# Altium PCB Afrodite V11_Final_3K.PcbDoc
Units mm, origin at the board's own origin, x right, y up, seen from the top; angles counter-clockwise.
Board outline 76.01 x 102.81 mm, 2 copper layers (Top Layer, Bottom Layer); 40 components, 30 nets, 155 pads, 7 vias.
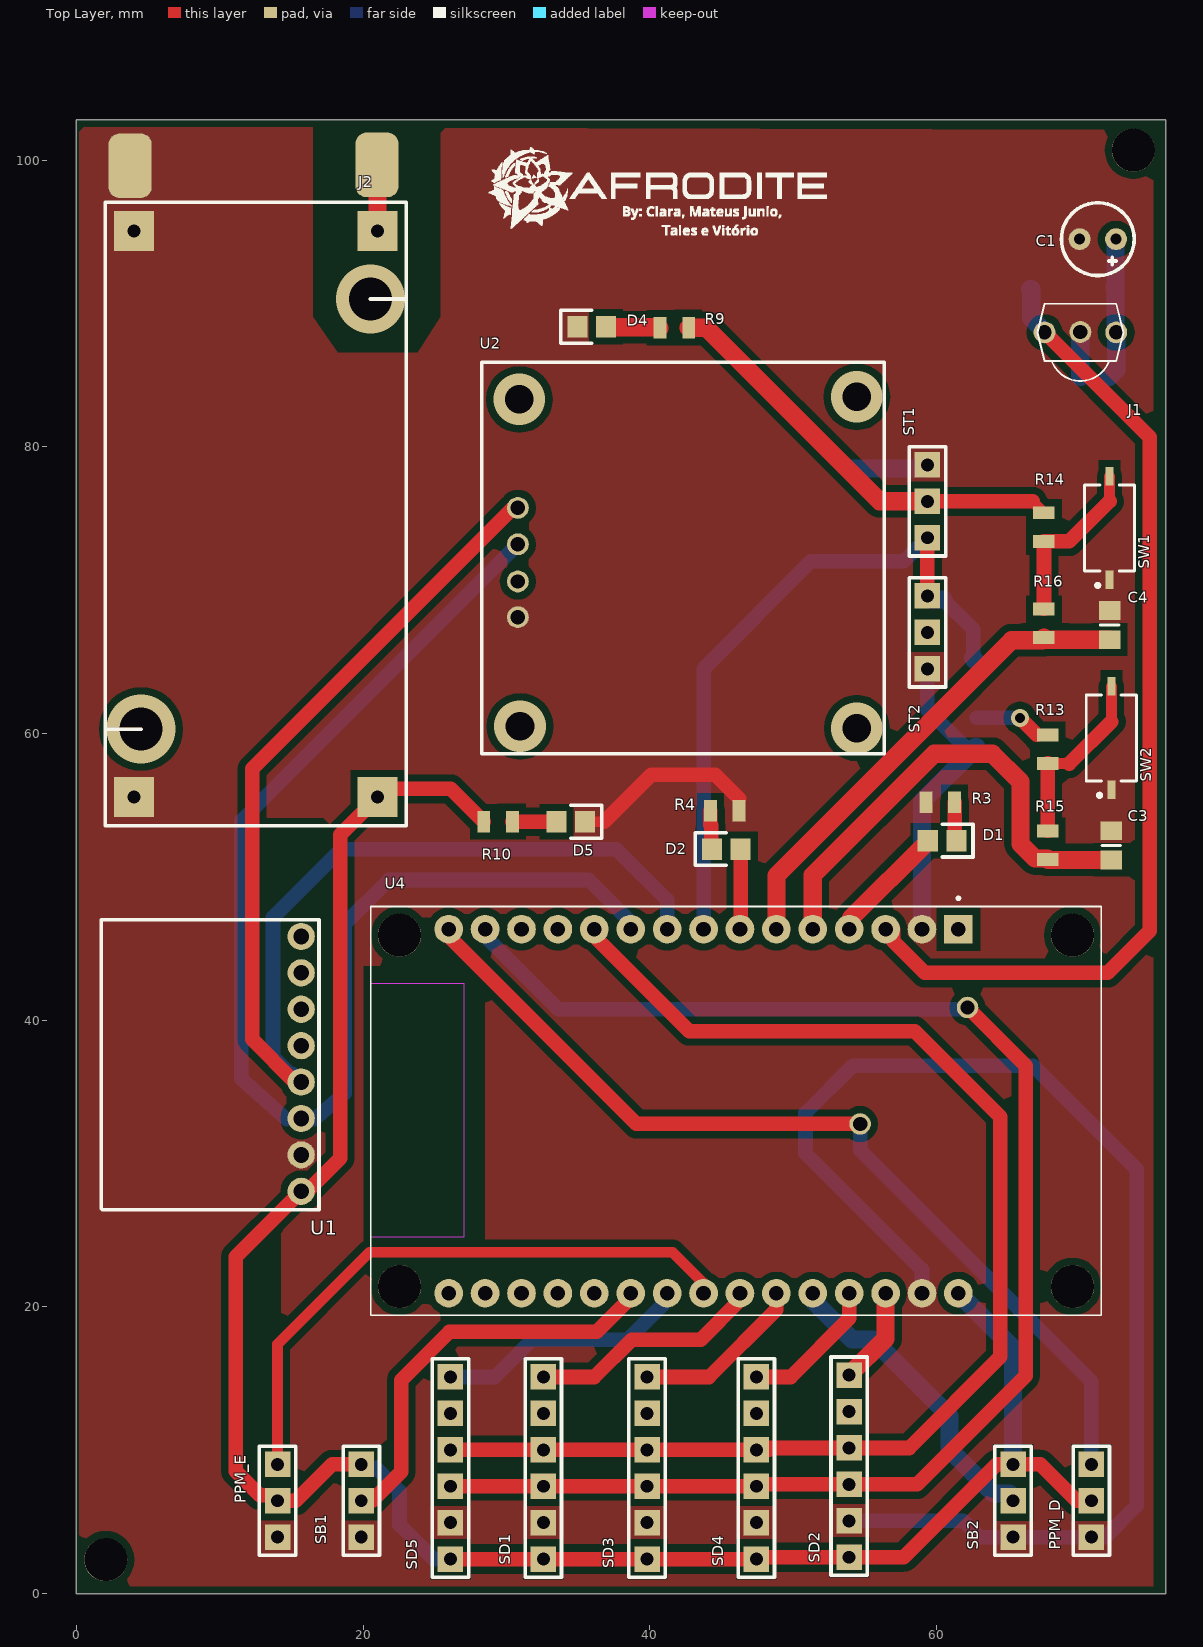
[diagram p0: Top Layer view]
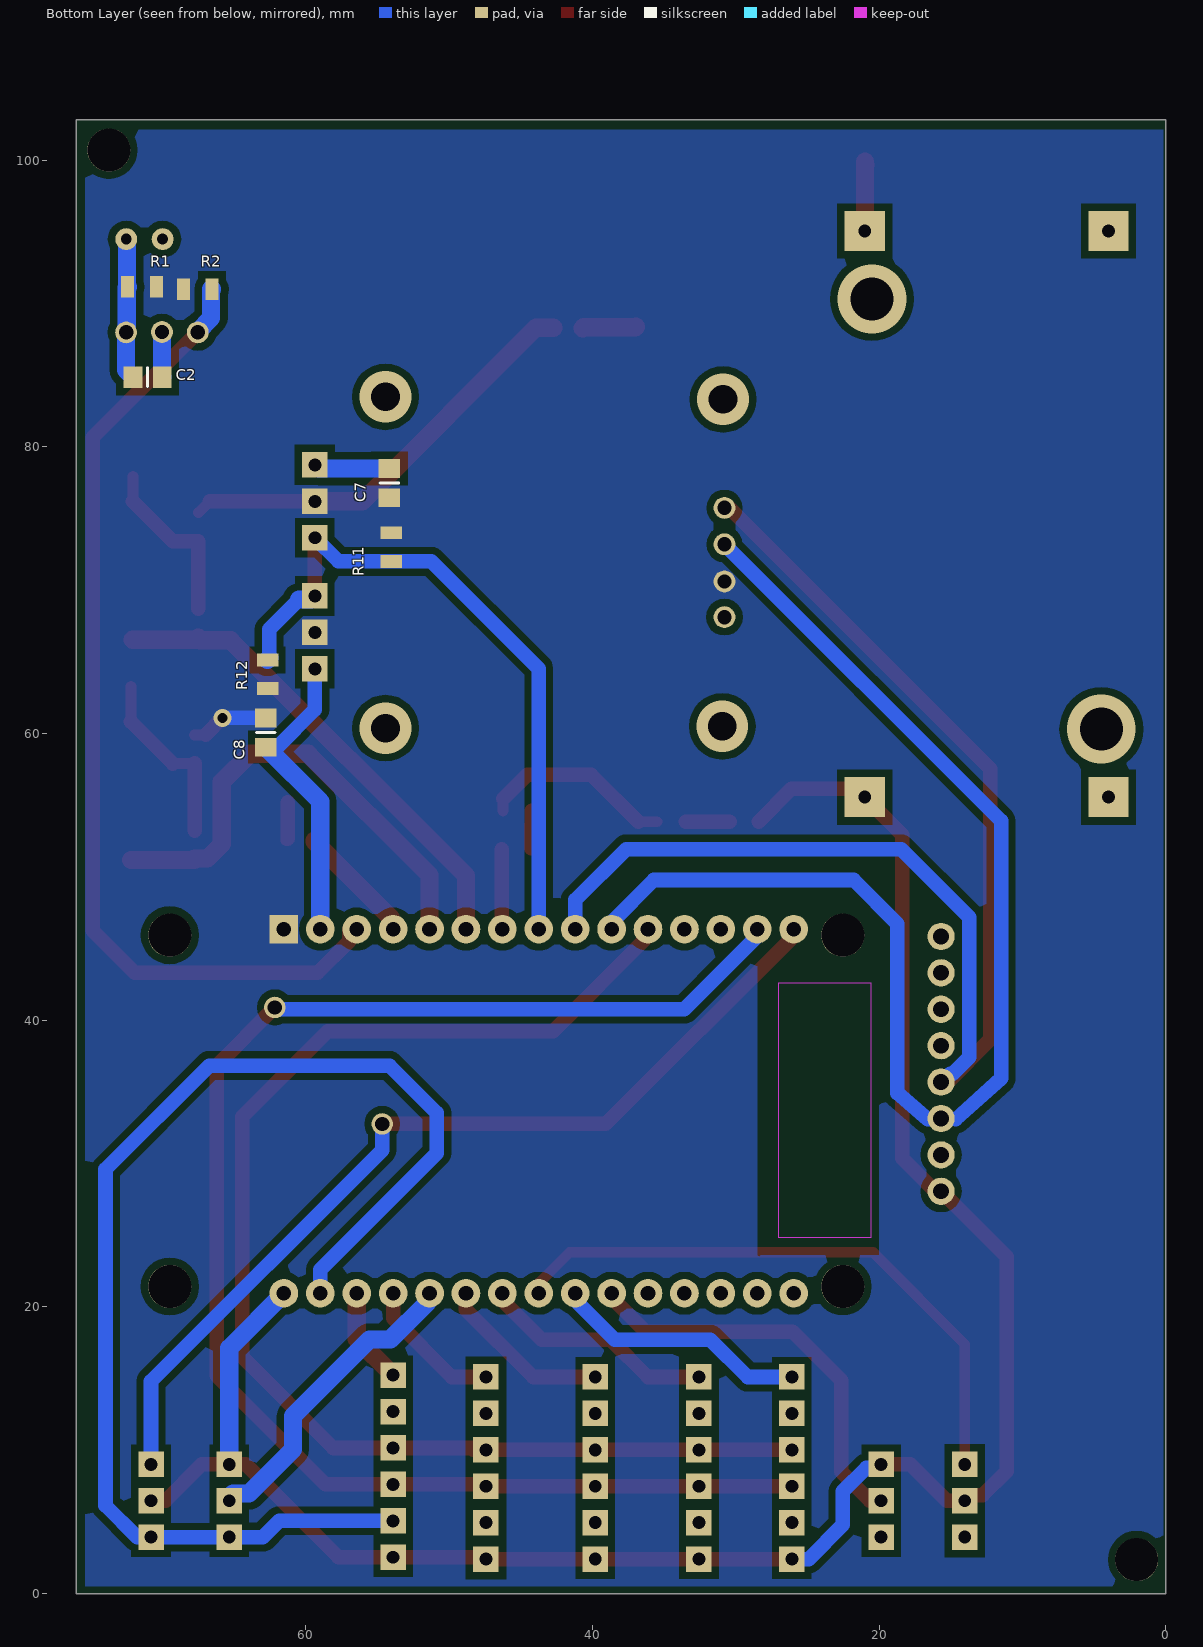
[diagram p1: Bottom Layer view, seen from below]

## Layer stack, top to bottom
Top Solder: solder mask 0.0102, Solder Resist, Dk 3.5
Top Layer: signal copper 0.0356
Dielectric 1: dielectric 0.32, FR-4, Dk 4.8
Bottom Layer: signal copper 0.0356
Bottom Solder: solder mask 0.0102, Solder Resist, Dk 3.5

## Board outline
0,0 0,102.806 76.01,102.806 76.01,0

## Design rules (kind name [scope] priority, off if disabled: settings)
Clearance [All] p1: gap=0.508 ignorepadtopadclearanceinfootprint=FALSE
PlaneConnect [All] p1: planeconnectstyle=Direct reliefexpansion=0.508 reliefentries=4 reliefconductorwidth=0.254 reliefairgap=0.254
PolygonConnect [All] p1: connectstyle=Direct reliefconductorwidth=0.254 reliefentries=4 polygonreliefangle="90 Angle" airgapwidth=0.254
RoutingVias [All] p1: holewidth=0.711 width=1.27 viastyle="Through Hole" minholewidth=0.711 minwidth=1.27 maxholewidth=0.711 maxwidth=1.27
SolderMaskExpansion [All] p1: expansion=0.102
Width [All] p1: maxlimit=1.27 minlimit=0.762 preferedwidth=1.016 minimp=50.000000 maximp=50.000000 favimp=50.000000
29 further rules are at their usual default settings.

## Components (designator, comment, footprint, x,y, rotation, side; value= is the part's Value field where it differs from the comment)
C1 "CAP" "CAP ELET .100" 71.26,94.49 r0 top
C2 "CAP" "CAP 0805" 71.04,84.87 r0 bottom
C3 "CAP" "CAP 0805" 72.2,52.197 r270 top
C4 "CAP" "CAP 0805" 72.073,67.564 r270 top
C7 "CAP" "CAP 0805" 54.166,77.47 r90 bottom
C8 "CAP" "CAP 0805" 62.802,60.071 r270 bottom
D1 "LED" "LED 0805" 60.394,52.533 r0 top
D2 "LED" "LED 0805" 45.345,51.943 r180 top
D4 "LED" "LED 0805" 35.96,88.38 r180 top
D5 "LED" "LED 0805" 34.497,53.848 r0 top
J1 "TSOP1838" TSOP18XX 70.041,88.011 r0 top
J2 "Component_1" PCB_LM2596 16.828,69.215 r270 top
PPM_D "CONECTOR_3PIN" CON3 70.803,3.937 r90 top
PPM_E "CONECTOR_3PIN" CON3 14.034,3.937 r90 top
R1 "RESISTOR" "RES 0805" 71.43,91.16 r180 bottom value=100
R2 "RESISTOR" "RES 0805" 67.54,91 r0 bottom value=20k
R3 "RESISTOR" "RES 0805" 60.267,55.2 r180 top value=220
R4 "RESISTOR" "RES 0805" 45.234,54.61 r0 top value=220
R9 "RESISTOR" "RES 0805" 41.72,88.31 r180 top value=220
R10 "RESISTOR" "RES 0805" 29.417,53.848 r0 top value=220
R11 "RESISTOR" "RES 0805" 54.039,73.009 r270 bottom value=10k
R12 "RESISTOR" "RES 0805" 62.675,64.135 r90 bottom value=10k
R13 "RESISTOR" "RES 0805" 67.755,58.912 r90 top value=10k
R14 "RESISTOR" "RES 0805" 67.501,74.406 r90 top value=10k
R15 "RESISTOR" "RES 0805" 67.755,52.213 r270 top value=100
R16 "RESISTOR" "RES 0805" 67.501,67.691 r270 top value=100
SB1 "CONECTOR_3PIN" CON3 19.876,3.937 r90 top
SB2 "CONECTOR_3PIN" CON3 65.342,3.937 r90 top
SD1 "CONECTOR_6PIN" CON6 32.576,15.113 r270 top
SD2 "CONECTOR_6PIN" CON6 53.912,15.24 r270 top
SD3 "CONECTOR_6PIN" CON6 39.815,15.113 r270 top
SD4 "CONECTOR_6PIN" CON6 47.435,15.113 r270 top
SD5 "CONECTOR_6PIN" CON6 26.099,15.113 r270 top
ST1 "CONECTOR_3PIN" CON3 59.373,78.74 r270 top
ST2 "CONECTOR_3PIN" CON3 59.373,64.516 r90 top
SW1 "PushButtonSMD" PUSHBUTTON.SMD 72.073,74.339 r90 top
SW2 "PushButtonSMD" PUSHBUTTON.SMD 72.2,59.69 r90 top
U1 "Sensor giroscopio acelerometro" mpu6050 16.193,28.067 r180 top value=MPU6050
U2 "Displat OLED 128x64" "Display OLED" 28.41,58.598 r90 top
U4 "ESP32-DEVKIT-V1" MODULE_ESP32_DEVKIT_V1 46.017,33.655 r270 top

## Footprints (in the part's own frame and the unit in brackets; to place one, negate y for a bottom-side part, rotate by r counter-clockwise, add the part's x,y. Pads: shape width x height; smd on the part's side, far side on the other; paste and mask are expansions set on the pad)
"CAP 0805" [mm] "0805"
  rect 1.3x1.5 smd: 1(-1.016,0) 2(1.016,0)
  silkscreen extent 0,-0.65 0,0.65, body extent -1.03,-0.61 0.97,0.59, height 0.88
"CAP ELET .100" [mil]
  round 60 hole 30: 1(-50,0) 2(50,0)
  silkscreen extent -100,-100 100,100, body extent -98,-99 98,98, height 453
CON3 [mil]
  rect 70x70 hole 35.43: 1(0,0) 2(100,0) 3(200,0)
  silkscreen extent -50,-50 250,50, body extent -39,-47 239,46, height 519
CON6 [mil]
  rect 70x70 hole 35.43: 1(0,0) 2(100,0) 3(200,0) 4(300,0) 5(400,0) 6(500,0)
  silkscreen extent -50,-50 550,50, body extent -50,-47 543,46, height 519
"Display OLED" [mil]
  round 60 hole 39.37: 1(375,-94) 2(473,-94) 3(575,-94) 4(675,-94)
  silkscreen extent 0,-1100 1075,5, body extent -265,-1098 1049,-1, height 426
"LED 0805" [mm] "0805"
  rect 1.4x1.5 smd: 1(-1,0) 2(1,0)
  silkscreen extent 0,-1.14 2.16,1.14, body extent -1.03,-0.4 1.03,0.51, height 0.85
MODULE_ESP32_DEVKIT_V1 [mm]
  rect 2x2 hole 1.02: 1(-12.7,15.515)
  round 2 hole 1.02: 2(-12.7,12.975) 3(-12.7,10.435) 4(-12.7,7.895) 5(-12.7,5.355) 6(-12.7,2.815) 7(-12.7,0.275) 8(-12.7,-2.265) 9(-12.7,-4.805) 10(-12.7,-7.345) 11(-12.7,-9.885) 12(-12.7,-12.425) 13(-12.7,-14.965) 14(-12.7,-17.505) 15(-12.7,-20.045) 16(12.7,-20.045) 17(12.7,-17.505) 18(12.7,-14.965) 19(12.7,-12.425) 20(12.7,-9.885) 21(12.7,-7.345) 22(12.7,-4.805) 23(12.7,-2.265) 24(12.7,0.275) 25(12.7,2.815) 26(12.7,5.355) 27(12.7,7.895) 28(12.7,10.435) 29(12.7,12.975) 30(12.7,15.515)
  round 3 hole 3 unplated: ""(-12.28,23.475) ""(-12.28,-23.475) ""(12.23,23.475) ""(12.23,-23.475)
  Keep-Out Layer region: 8.78,-25.475 -8.91,-25.475 -8.91,-18.985 8.78,-18.985
  Keep-Out Layer region: 8.78,-25.475 -8.91,-25.475 -8.91,-18.985 8.78,-18.985
  silkscreen extent -14.95,-25.47 14.23,25.47, body extent -14.22,-25.53 14.28,25.4, height 7.24
mpu6050 [mm]
  round 1.9 hole 1.1: 1(0.508,0) 2(0.508,-2.54) 3(0.508,-5.08) 4(0.508,-7.62) 5(0.508,-10.16) 6(0.508,-12.7) 7(0.508,-15.24) 8(0.508,-17.78)
  silkscreen extent -0.74,-18.95 14.45,1.3, body extent -3.86,-19.02 14.5,1.3, height 36.48
PCB_LM2596 [mm]
  rect 2.8x2.8 hole 0.9: 1(-25.846,4.182) 2(-25.846,-12.818) 3(13.654,4.182) 4(13.654,-12.818)
  silkscreen extent -27.85,-14.82 15.65,6.18, body extent -27.85,-14.82 15.65,6.18, height 13.02
PUSHBUTTON.SMD [mm] "SODFL, 2-Leads, Body 3,40x7,98mm, IPC Medium Density"
  rect 1.3x0.55 smd: 1(-3.6,0) 2(3.6,0)
  silkscreen extent -4.12,-1.75 3,1.75, body extent -3,-1.75 3,1.75, height 2
"RES 0805" [mm] "0805 (1/8W)"
  rect 0.9x1.5 smd: 1(-1,0) 2(1,0)
  body extent -1.02,-0.63 0.95,0.6, height 0.48
TSOP18XX [mil]
  round 60 hole 39.37: 1(98.38,-1.05) 2(-98.47,-1.05) 3(0,0)
  silkscreen extent -118,-134 118,78, body extent -143,-143 146,50, height 706

## Part data
C1: library part "CAP. ELETROLÍTICO", "Capacitor", Valor=10nF
C2 C3 C4 C7 C8: library part "CAP. CERÂMICO", "Capacitor", Criado em=26/06/2012, Criador por="Luigi Eduardo", Pertence a=Trincabotz
  C2: Valor=100uF
  C3 C4 C7 C8: Valor=100nF
J1: "IR Receiver and Demodulator", Package=None, Availability=Unavailable, MP=TSOP1838, Price=None
R1 R2 R3 R4 R9 R10 R11 R12 R13 R14 R15 R16: "Resistor"
U1: library part mpu6050, "Sera usado na afrodite"
U2: library part "Display OLED"
U4: "Dual core, Wi-Fi: 2.4 GHz up to 150 Mbits/s,BLE (Bluetooth Low Energy) and legacy Bluetooth, 32 bits, Up to 240 MHz", Package=None, Availability=Unavailable, MP=ESP32-DEVKIT-V1, Price=None

## Free pads (board coordinates)
  round 1.5 hole 1: 9(54.674,32.766) 15(62.167,40.894)
  rrect50% 3x4.5 smd: 17(3.75,99.61) 17(20.97,99.67)
  round 3 hole 3 unplated: 19(2.05,2.37) 19(73.74,100.7)

## Via types
v1: diameter 3.6, hole 2, Top Layer to Bottom Layer, 4 vias
v2: diameter 4.8, hole 3, Top Layer to Bottom Layer, 2 vias
v3: diameter 1.27, hole 0.711, Top Layer to Bottom Layer, 1 vias

## Nets (pads, with @x,y where several pads share a name; then routed paths per layer and width w, separated by ;. In a path a pad name is that pad's centre, name@x,y a point inside that pad or via, vN(x,y) a via of type N, cw(c..) or ccw(c..) an arc to the next point about the centre after c; other vN are vias at no path point)
3V3: C7.1 C8.1 R1.2 R2.2 R9.1 R11.1 R12.1 R13.2 R14.2 ST1.2 ST2.2 U2.2 U4.1 | length 35.6
  Top Layer w0.762: 66.707,76.2 R14.2 ; 67,59.912 R13.2
  Top Layer w1.016: ST1.2 66.707,76.2 ; v3(65.825,61.087) 67,59.912
  Top Layer w1.27: R9.1 43.94,88.31 56.05,76.2 ST1.2
  Bottom Layer w1.016: C8.1 v3(65.825,61.087)
5V: J2.3 PPM_D.2 PPM_E.2 R10.1 SB1.3 SB2.3 SD1.6 SD2.6 SD3.6 SD4.6 SD5.6 U1.1 U4.30 | length 143
  Top Layer w1.016: SB1.3 17.844,9.017 15.304,6.477 PPM_E.2 13.653,6.858 12.799,6.858 11.113,8.544 11.113,23.495 U1.1 16.105,28.067 18.398,30.361 18.398,52.95 J2.3 21.583,56.134 26.131,56.134 R10.1 ; SD5.6 SD1.6 SD3.6 SD4.6 47.562,2.54 SD2.6 57.722,2.54 64.199,9.017 SB2.3 67.253,9.017 69.793,6.477 PPM_D.2
  Bottom Layer w1.016: SB1.3 20.13,8.763 20.907,8.763 22.543,7.127 22.543,4.797 24.927,2.413 SD5.6
  Bottom Layer w1.27: U4.30 65.342,17.145 SB2.3
DOWN: C4.2 R16.2 U4.6 | length 34
  Top Layer w1.27: U4.6 48.832,50.096 65.242,66.506 67.386,66.506 67.501,66.621 R16.2 ; R16.2@67.501,66.678 67.631,66.548 C4.2
GND: C1.1 C2.1 C3.1 C4.1 C7.2 C8.2 D4.2 D5.2 J1.3 J2.2 J2.4 pad.17@3.75,99.61 PPM_D.1 PPM_E.1 R3.2 R4.2 SB1.1 SB2.1 SD1.5 SD2.5 SD3.5 SD4.5 SD5.5 ST1.1 ST2.1 SW1.1 SW2.1 U1.2 U2.1 U4.2 U4.29 | length 131.3
  Top Layer w0.762: D5.2 36.818,53.848 ; R4.2 46.234,55.466
  Top Layer w1.016: 36.818,53.848 40.11,57.14 44.56,57.14 46.234,55.466
  Bottom Layer w1.016: SD2.5 61.87,5.08 63.013,3.937 SB2.1 PPM_D.1 71.768,3.937 73.978,6.147 73.978,29.591 66.739,36.83 54.166,36.83 50.864,33.528 50.864,30.734 58.992,22.606 U4.29 ; ST2.1 59.373,61.679 61.997,59.055
  Bottom Layer w1.27: C7.2 59.119,78.486 ST1.1 ; U4.2 58.992,55.245 62.687,58.94 62.687,59.04 62.702,59.055 C8.2 ; C2.1 70.032,84.878 70.032,88.002 J1.3
LED_D1: D1.1 U4.4 | length 8.4
  Top Layer w1.27: U4.4 54.052,46.495 54.052,47.141 59.394,52.483 D1.1
LED_D2: D2.1 U4.7 | length 5.6
  Top Layer w0.762: U4.7 U4.7@46.345,46.408
  Top Layer w1.016: U4.7@46.345,46.408 D2.1
NetC1_2: C1.2 C2.2 J1.1 R1.1 | length 9.9
  Bottom Layer w1.27: C2.2 72.54,85.354 J1.1 72.491,88.033 72.491,91.099 R1.1 72.481,91.211 72.481,94.441 C1.2
NetD1_2: D1.2 R3.1 | length 2.7
  Top Layer w0.762: D1.2@61.267,52.66 D1.2
  Top Layer w1.016: D1.2@61.267,52.66 R3.1
NetD2_2: D2.2 R4.1 | length 2.7
  Top Layer w0.762: 44.234,53.64 44.29,53.585 ; D2.2@44.29,51.999 D2.2
  Top Layer w1.016: 44.234,53.64 R4.1 ; D2.2@44.29,51.999 44.29,53.585
NetD4_1: D4.1 R9.2 | length 3.8
  Top Layer w0.762: R9.2@40.688,88.278 R9.2
  Top Layer w1.27: D4.1 36.995,88.345 40.621,88.345 R9.2@40.688,88.278
NetD5_1: D5.1 R10.2 | length 3.1
  Top Layer w1.016: R10.2 D5.1
NetR13_1: R13.1 R15.1 SW2.2 | length 12.8
  Top Layer w0.762: R13.1 69.279,57.912 ; 72.2,60.833 SW2.2
  Top Layer w1.016: R15.1 R13.1 ; 69.279,57.912 72.2,60.833
NetR14_1: R14.1 R16.1 SW1.2 | length 12.2
  Top Layer w0.762: 72.073,76.2 SW1.2
  Top Layer w1.016: R16.1 R14.1 69.279,73.406 72.073,76.2
PPM_D: pad.9 PPM_D.3 U4.15 | length 65
  Top Layer w1.016: U4.15 25.972,45.864 39.07,32.766 pad.9
  Bottom Layer w1.016: pad.9 54.674,30.946 70.803,14.817 PPM_D.3
PPM_E: PPM_E.3 U4.23 | length 42.4
  Top Layer w0.762: PPM_E.3 14.034,17.399 20.449,23.814 41.593,23.814 43.752,21.655 U4.23
SB1: SB1.2 U4.21 | length 28.7
  Top Layer w1.016: SB1.2 20.647,6.477 22.66,8.49 22.66,14.889 26.031,18.26 36.288,18.26 38.672,20.644 U4.21
SB2: SB2.2 U4.26 | length 21.8
  Bottom Layer w1.27: U4.26 51.512,20.815 51.512,20.325 54.113,17.723 55.567,17.723 60.9,12.39 60.9,10.065 63.98,6.985 65.088,6.985 65.088,6.731 SB2.2
SCL: pad.15 SD1.4 SD2.4 SD3.4 SD4.4 SD5.4 U4.14 | length 107
  Top Layer w1.016: SD5.4 SD1.4 SD3.4 SD4.4 47.562,7.62 SD2.4 58.646,7.62 66.231,15.205 66.231,36.83 pad.15
  Bottom Layer w1.016: U4.14 28.512,45.864 33.609,40.767 62.04,40.767 pad.15
SCL_AUX: U1.3 U2.3 U4.10 | length 89
  Bottom Layer w1.016: U2.3 11.494,53.899 11.494,35.946 14.665,33.093 U1.3 16.598,33.079 18.733,34.92 18.733,46.736 21.781,49.784 35.734,49.784 38.672,46.846 U4.10
SDA: SD1.3 SD2.3 SD3.3 SD4.3 SD5.3 U4.11 | length 91.8
  Top Layer w1.016: SD5.3 SD1.3 SD3.3 SD4.3 48.324,10.033 48.451,10.16 SD2.3 58.103,10.16 64.453,16.51 64.453,33.274 58.484,39.243 42.753,39.243 36.132,45.864 U4.11
SDA_AUX: U1.4 U2.4 U4.9 | length 95
  Top Layer w1.016: U1.4 15.233,35.687 12.256,38.664 12.256,57.531 30.468,75.743 U2.4
  Bottom Layer w1.016: U1.4 15.624,35.687 15.05,36.261 14.871,36.261 13.719,37.413 13.719,47.183 18.479,51.943 37.656,51.943 41.212,48.387 U4.9
SEN_TEMP: R11.2 R12.2 ST1.3 ST2.3 U4.8 | length 48
  Top Layer w1.016: ST2.3 ST1.3
  Bottom Layer w1.016: U4.8 43.752,64.522 51.239,72.009 R11.2 57.722,72.009 ST1.3 ; 60.481,69.342 62.56,67.263 R12.2@62.56,65.25
  Bottom Layer w1.27: ST2.3 59.627,69.342 60.481,69.342 ; R12.2@62.56,65.25 R12.2
SINAL_RECEP: J1.2 R2.1 U4.3 | length 69.6
  Top Layer w1.016: U4.3 56.976,46.355 56.976,45.52 59.189,43.307 71.946,43.307 74.867,46.228 74.867,80.657 J1.2
  Bottom Layer w1.27: R2.1 66.61,91 66.61,88.983 67.54,88.053 J1.2
UP: C3.2 R15.2 U4.5 | length 33.8
  Top Layer w1.27: U4.5 51.372,50.121 59.841,58.59 63.91,58.59 65.862,56.638 65.862,52.29 66.869,51.283 67.755,51.283 R15.2 67.787,51.181 C3.2
VBAT: J2.1 pad.17@20.97,99.67 | length 5.1
  Top Layer w1.27: pad.17@20.97,99.67 21,99.89 21,95.071 J2.1
XSHUT1: SD1.1 U4.24 | length 16.4
  Top Layer w1.016: SD1.1 36.132,15.113 38.736,17.717 43.545,17.717 46.292,20.464 U4.24
XSHUT2: SD2.1 U4.28 | length 6.8
  Top Layer w1.27: SD2.1 56.452,17.78 U4.28
XSHUT3: SD3.1 U4.25 | length 12.1
  Top Layer w1.016: SD3.1 44.133,15.113 48.832,19.812 U4.25
XSHUT4: SD4.1 U4.27 | length 9.9
  Top Layer w1.016: SD4.1 49.823,15.113 53.912,19.202 U4.27
XSHUT5: SD5.1 U4.22 | length 17.8
  Bottom Layer w1.016: SD5.1 29.182,15.113 31.786,17.717 38.465,17.717 41.212,20.464 U4.22
pads on no net: SD1.2 SD2.2 SD3.2 SD4.2 SD5.2 U1.5 U1.6 U1.7 U1.8 U4. U4.12 U4.13 U4.16 U4.17 U4.18 U4.19 U4.20
copper on no net:
  other v1: 54.445,60.376 30.95,60.503 30.9,83.312 54.445,83.49
  other v2: 4.51,60.311 20.51,90.311

## Polygon pours and split planes (outlines as drawn)
GND on Top Layer "GND" (solid, pour order 20): 0.191,102.349 0.191,0.508 75.121,0.508 75.121,102.108 35.624,102.235
3V3 on Bottom Layer "3V3" (solid, pour order 22): 0.191,102.108 0.191,0.508 75.375,0.508 75.375,102.108

## Other copper
Top Layer:
  pour cut-out: 19.069,102.289 18.853,102.073 18.853,102.289 16.481,102.289 16.48,89.09 18.24,86.55 23.83,86.55 25.41,89.09 25.41,102.289 23.556,102.289
  pour cut-out: 22.55,107.38
  pour cut-out: 14.645,39.727 14.411,39.493 14.411,38.877 14.105,38.57 14.015,38.66 13.56,38.66 13.05,39.17 13.05,54.14 17.208,54.14 17.764,53.584 17.532,53.351 17.532,46.852 17.26,46.58 17.258,46.582 16.751,46.582 16.066,47.267 15.685,46.887 14.645,46.887 14.645,46.278 14.214,45.847 14.645,45.416 14.645,44.276 14.265,43.895 14.265,42.648 14.645,42.267 14.645,41.736 14.214,41.305 14.214,40.158 14.645,39.727 14.411,39.493 14.411,38.962 14.214,38.962 13.736,38.484
  pour cut-out: 39.27,92.55
  pour cut-out: 38.45,94.48
  pour cut-out: 12.608,10.422 12.266,10.764 12.266,23.046 14.26,25.04 14.29,25.01 14.29,18.923 13.168,17.801 13.168,10.488 13.101,10.422
  pour cut-out: 20.024,42.565 20.024,43.794 20.003,43.815 28.512,43.815 28.512,23.495 28.385,23.622 20.003,23.622
  region net GND: 72.073,59.182
  region net 3V3: 71.877,72.279
Bottom Layer:
  pour cut-out: 36.449,51.046 37.285,51.046 40.281,48.05 40.281,47.545 40.163,47.426 39.234,47.426 36.032,50.628
  pour cut-out: 28.15,49.49 28.15,47.21 35.86,47.21 36.26,47.61 35.44,48.43 35.44,49.22
  pour cut-out: 22.58,51.32 21.05,49.79 20.83,49.79 18.11,47.07 18.11,36.19 17.66,35.74 17.6,35.8 16.32,35.8 15.23,36.89 15.23,47.89 18.76,51.42
  pour cut-out: 20.063,42.763
  pour cut-out: 20.024,42.565 18.28,48.49 28.512,49.01 28.512,23.622 28.385,23.495 28.258,23.622 20.003,23.622
  pour cut-out: 19.876,42.545
  pour cut-out: 20.063,42.763
  pour cut-out: 20.176,42.931

## Silkscreen, mask and mechanical layers (free items; w line width, h text height)
Top Overlay:
  drawing of 2886 lines, arcs and shapes, not listed
Mechanical 1:
  the board outline again, w0.254